# Altium PCB VA_HUB_PCB.PcbDoc (part 8 of 12)
Units mil, origin at the board's own origin, x right, y up, seen from the top; angles counter-clockwise.
Board outline 4408 x 3619 mil, 8 copper layers (Top Layer, Routing 1, Routing 2, Power Plane, GND Plane, Routing 3, Routing 4, Bottom Layer), stack 85.156 mil thick; 569 components, 440 nets, 2911 pads, 1518 vias.
Unrouted connection lines stored in the file: 46.
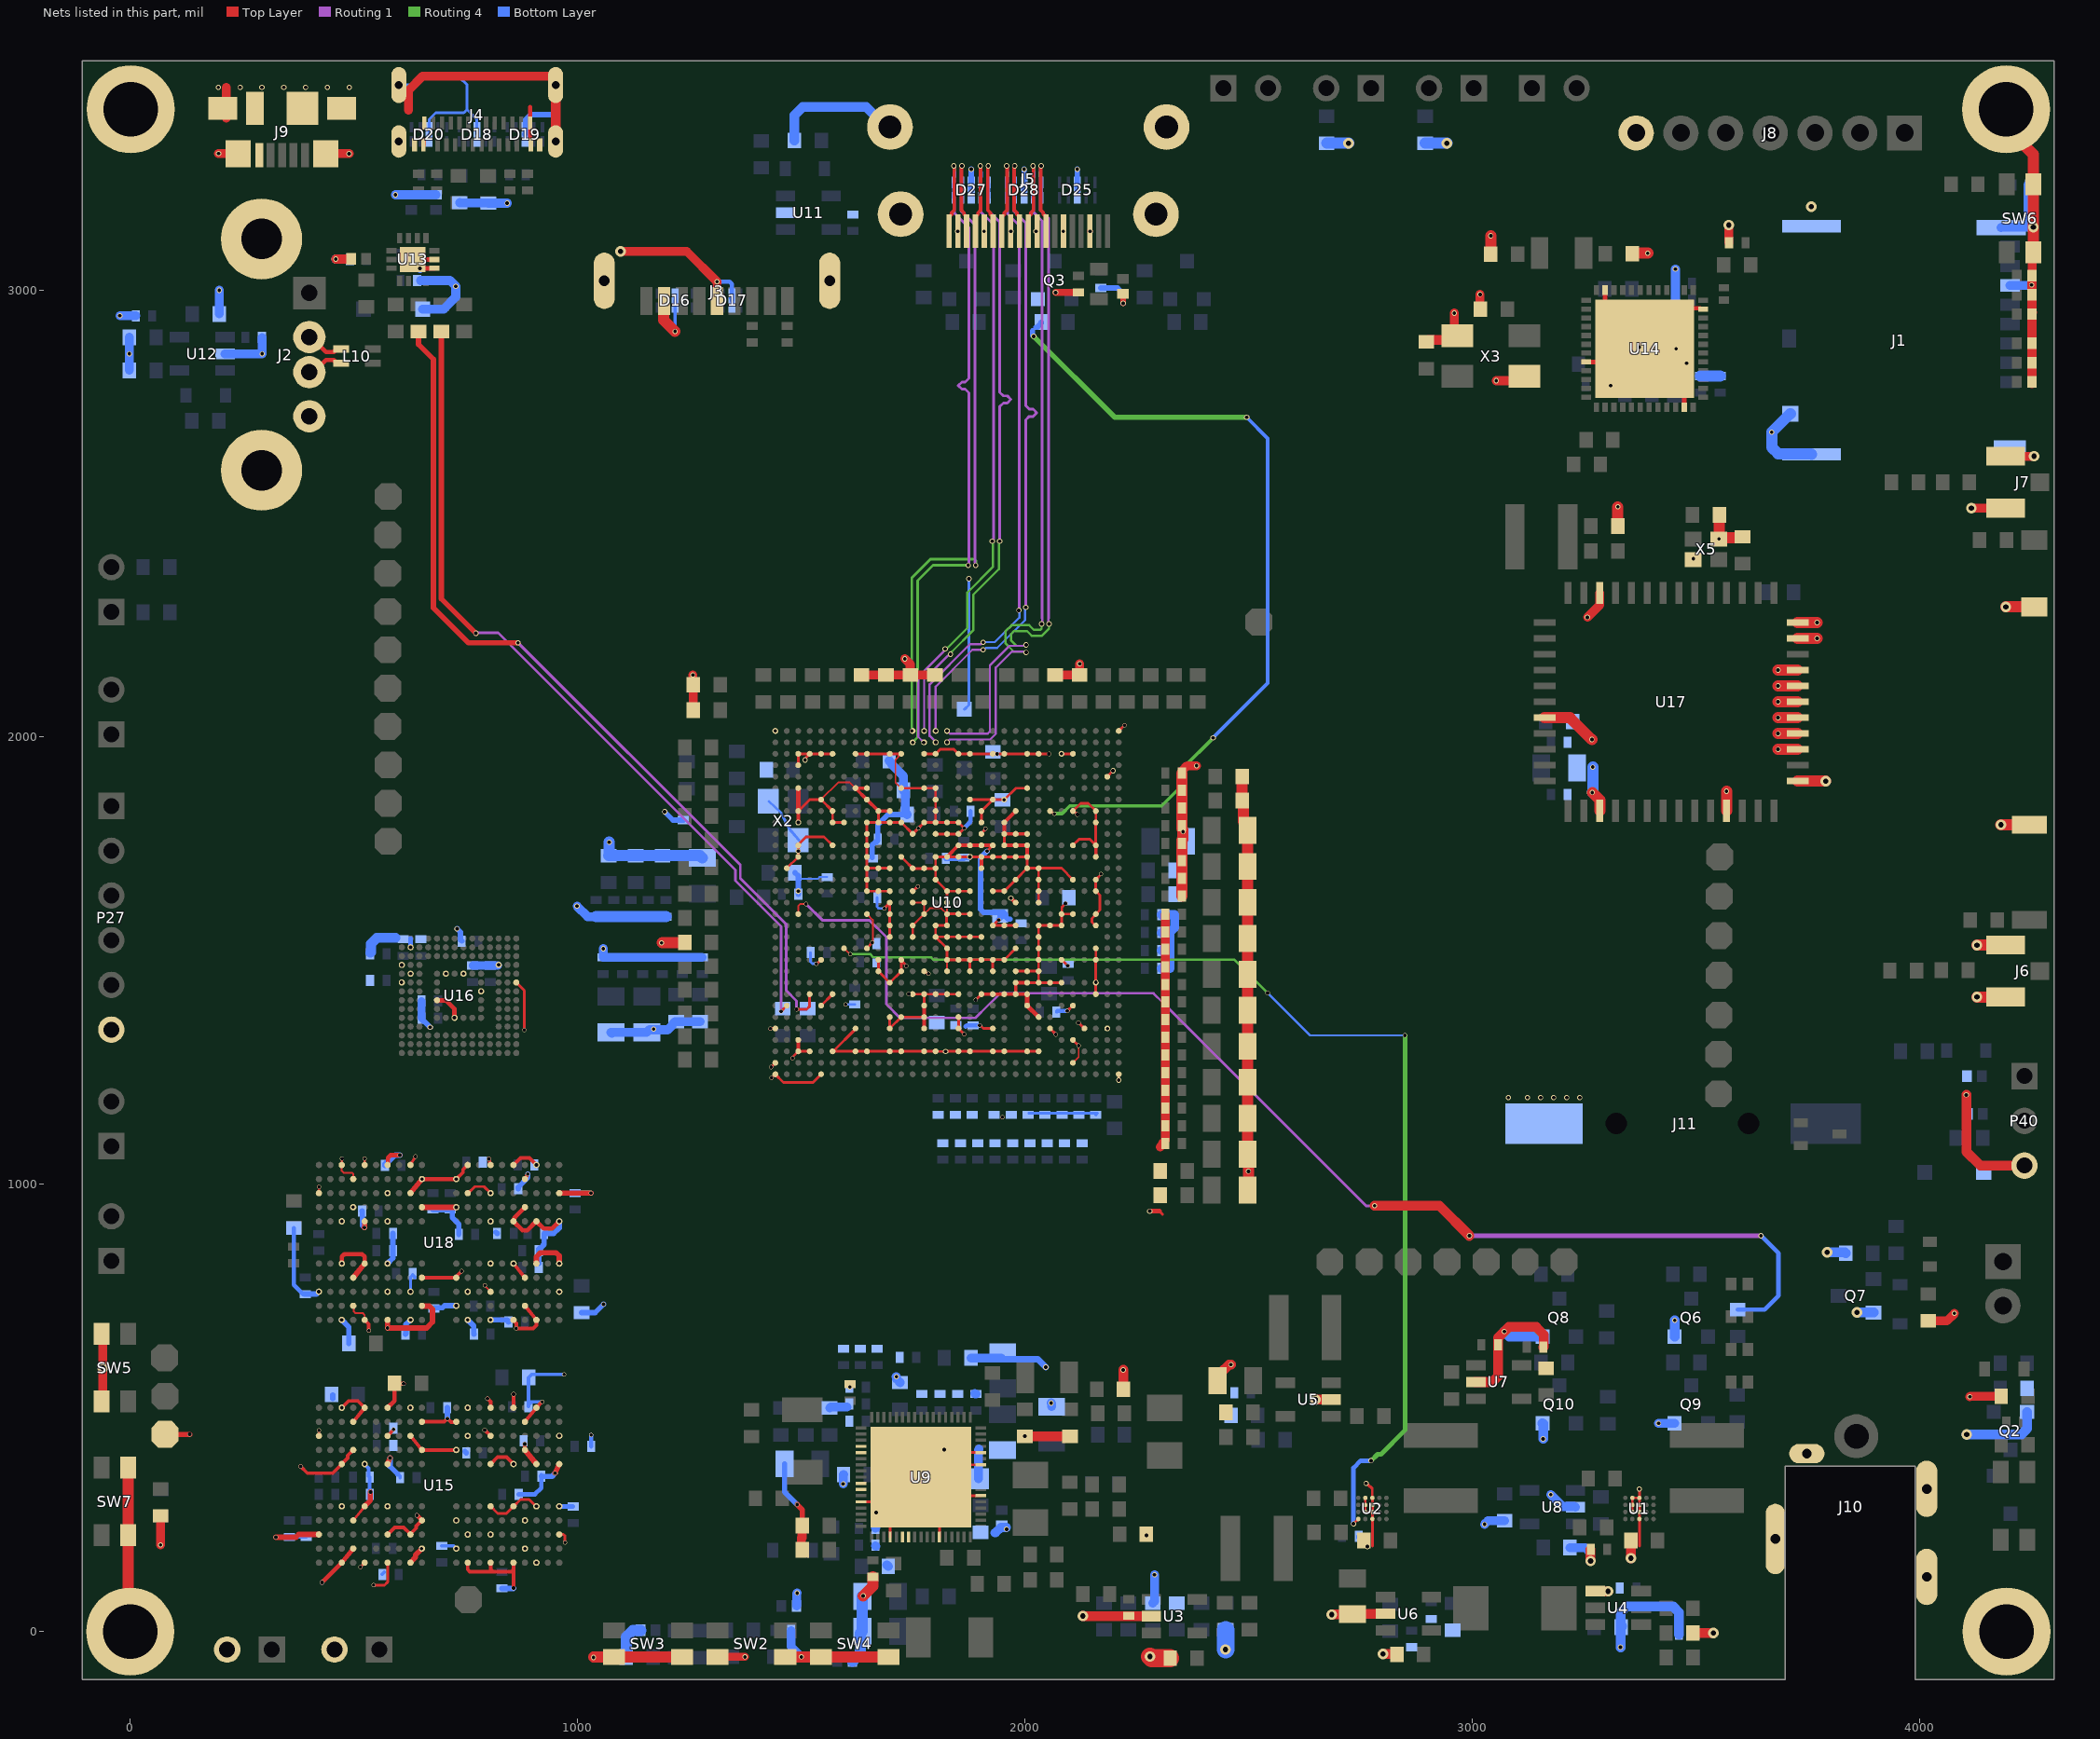
[diagram p11: the nets of this part, all layers, seen from the top]

## Via types
v1: diameter 9.84, hole 7.87, Top Layer to Bottom Layer, 821 vias
v2: diameter 11.81, hole 7.87, Top Layer to Bottom Layer, 575 vias
v3: diameter 23.62, hole 11.81, Top Layer to Bottom Layer, 122 vias

## Nets (pads, with @x,y where several pads share a name; then routed paths per layer and width w, separated by ;. In a path a pad name is that pad's centre, name@x,y a point inside that pad or via, vN(x,y) a via of type N, cw(c..) or ccw(c..) an arc to the next point about the centre after c; other vN are vias at no path point) (continued)
GND: ANT1.2 ANT2.2 C2.2 C3.2 C4.2 C5.2 C6.2 C8.2 C10.2 C11.2 C12.2 C13.2 C14.2 C15.2 C16.2 C17.2 C18.2 C19.2 C20.2 C21.2 C22.2 C23.2 C25.2 C26.1 C27.1 C28.2 C29.2 C30.2 C31.1 C32.1 C33.2 C35.2 C36.2 C37.2 C38.2 C39.2 C40.2 C41.2 C42.2 C44.2 C45.1 C46.2 C47.2 C48.2 C49.1 C50.1 C51.2 C52.2 C53.2 C54.2 C55.2 C56.2 C57.2 C58.2 C59.2 C60.2 C62.2 C63.2 C64.2 C65.2 C66.2 C67.2 C68.2 C69.2 C70.2 C71.2 C72.2 C73.2 C74.2 C75.2 C76.2 C77.2 C78.2 C79.2 C80.2 C81.2 C82.2 C83.2 C84.2 C85.2 C86.2 C87.2 C88.2 C89.2 C90.2 C91.2 C92.2 C93.2 C94.2 C95.2 C96.2 C97.2 C98.2 C99.2 C100.2 C101.2 C102.2 C103.2 C104.2 C105.2 C106.2 C107.2 C108.2 C109.2 C110.2 C111.2 C112.2 C113.2 C114.2 C115.2 C116.2 C117.2 C118.2 C119.2 C120.2 C121.2 C122.2 C123.2 C124.2 C125.2 C126.2 C127.2 C128.2 C129.2 C130.2 C131.2 C132.2 C133.2 C134.2 C135.2 C136.2 C137.2 C138.2 C139.2 C140.2 C141.2 C142.2 C143.2 C144.2 C145.2 C146.2 C147.2 C148.1 C149.1 C150.2 C151.1 C152.2 C153.2 C154.2 C155.2 C156.2 C157.2 C158.2 C161.2 C162.2 C163.2 C164.2 C165.2 C166.2 C173.2 C174.2 C175.2 C176.2 C177.2 C178.2 C179.2 C180.2 C181.1 C182.1 C183.2 C184.1 C185.1 C186.1 C187.1 C188.2 C189.2 C190.2 C191.2 C192.2 C193.2 C194.2 C195.2 C196.2 C197.2 C198.2 C199.2 C200.2 C201.2 C202.2 C203.2 C204.2 C205.2 C206.2 C207.2 C208.2 C209.2 C210.2 C211.2 C212.2 C213.2 C214.2 C215.2 C216.2 C217.2 C218.2 C219.2 C220.2 C221.2 C222.2 C223.2 C224.2 C225.2 C226.2 C227.2 C228.2 C229.2 C230.1 C231.2 C232.2 C233.2 C234.2 C235.2 C236.2 C237.2 C238.2 C241.2 C242.2 C243.1 C244.1 C245.2 C246.2 C247.2 C248.2 C249.2 C250.2 C251.2 C252.2 C253.2 C254.2 C255.2 C256.2 C257.2 C258.2 C259.2 C260.2 C261.2 D2.1 D4.1 D5.1 D6.2 D8.1 D9.2 D10.2 D11.2 D12.2 D13.2 D14.2 D16.3_8 D17.3_8 D18.3_8 D19.3_8 D20.3_8 D22.1 D23.2 D24.2 D25.3_8 D26.2 D27.3_8 D28.3_8 D31.1 D32.2 D33.2 ESD1.2 ESD2.2 J1.6 J1.9 J1.P1 J1.P2 J1.P3 J1.P4 J2.4 J2.MH1 J2.MH2 J3.4 J3.7 J3.MH1 J3.MH2 J4.A1 J4.A12 J4.B1 J4.B12 J4.G1 J4.G2 J4.S1 J4.S2 J4.S3 J4.S4 J5.2 J5.5 J5.8 J5.11 J5.14 J5.17 J5.MH1 J5.MH2 J5.MH3 J5.MH4 J6.2 J6.3 J7.2 J7.3 J8.7 J9.5 J9.MP1 J9.MP2 J9.MP3 J9.MP4 J9.MP5 J9.MP6 J10.2 J10.3 J10.4 J10.5 J11.2 P10.2 P16.2 P25.1 P27.6 P40.3 pad.MH1 pad.MH2 pad.MH3 pad.MH4 Q2.2 Q6.2 Q7.2 Q8.2 Q9.2 Q10.2 R4.2 R6.1 R15.2 R18.2 R25.2 R29.1 R32.1 R34.1 R38.1 R47.1 R48.1 R50.2 R51.2 R52.2 R56.2 R59.2 R60.1 R61.1 R65.2 R75.2 R76.1 R77.2 R78.2 R80.2 R81.1 R82.1 R84.2 R88.1 R89.1 R101.2 R102.2 R119.1 SB28.1 SB33.2 SW2.2 SW3.2 SW4.2 SW5.2 SW6.2 SW7.1 U1.B2 U1.B3 U1.B4 U1.C1 U1.C2 U1.C3 U1.C4 U2.B2 U2.B3 U2.B4 U2.C1 U2.C2 U2.C3 U2.C4 U3.2 U4.1 U5.2 U6.2 U7.2 U8.2 U9.21 U9.22 U9.27 U9.28 U9.30 U9.38 U9.40 U9.41 U9.46 U9.57 U9.62 U9.64 U9.69 U10.A1 U10.A27 U10.A31 U10.AA3 U10.AA5 U10.AA9 U10.AA10 U10.AA11 U10.AA12 U10.AA13 U10.AA14 U10.AA15 U10.AA23 U10.AA26 U10.AA29 U10.AB9 U10.AB10 U10.AB11 U10.AB13 U10.AB15 U10.AB16 U10.AB17 U10.AB19 U10.AB23 U10.AC3 U10.AC11 U10.AC13 U10.AC15 U10.AC16 U10.AC17 U10.AC18 U10.AC20 U10.AC21 U10.AC22 U10.AC23 U10.AC25 U10.AC26 U10.AC29 U10.AD3 U10.AD5 U10.AD10 U10.AD13 U10.AD17 U10.AD21 U10.AD22 U10.AD26 U10.AD29 U10.AE11 U10.AE12 U10.AE14 U10.AE17 U10.AE23 U10.AE27 U10.AF9 U10.AF17 U10.AF18 U10.AF20 U10.AF23 U10.AF24 U10.AF29 U10.AG2 U10.AH29 U10.AJ5 U10.AJ6 U10.AJ8 U10.AJ9 U10.AJ11 U10.AJ12 U10.AJ14 U10.AJ15 U10.AJ17 U10.AJ18 U10.AJ20 U10.AJ21 U10.AJ23 U10.AJ24 U10.AJ26 U10.AJ27 U10.AJ28 U10.AJ29 U10.AL1 U10.AL31 U10.B5 U10.B31 U10.C8 U10.C9 U10.C11 U10.C12 U10.C14 U10.C15 U10.C17 U10.C18 U10.C20 U10.C21 U10.C23 U10.C24 U10.C26 U10.C28 U10.C29 U10.D5 U10.D29 U10.E2 U10.E4 U10.E7 U10.E12 U10.E15 U10.E18 U10.E21 U10.E24 U10.E31 U10.F8 U10.F15 U10.F18 U10.F20 U10.F21 U10.G5 U10.G9 U10.G18 U10.G27 U10.H3 U10.H9 U10.H10 U10.H11 U10.H12 U10.H13 U10.H15 U10.H16 U10.H17 U10.H18 U10.H19 U10.H26 U10.J3 U10.J6 U10.J7 U10.J8 U10.J9 U10.J10 U10.J21 U10.K8 U10.K9 U10.K10 U10.K12 U10.K14 U10.K16 U10.K18 U10.K20 U10.K22 U10.L3 U10.L6 U10.L8 U10.L11 U10.L12 U10.L13 U10.L14 U10.L15 U10.L16 U10.L20 U10.L22 U10.L27 U10.M3 U10.M8 U10.M10 U10.M16 U10.M23 U10.N8 U10.N13 U10.N14 U10.N15 U10.N16 U10.N17 U10.N19 U10.N21 U10.P3 U10.P6 U10.P7 U10.P8 U10.P10 U10.P11 U10.P12 U10.P16 U10.P17 U10.P19 U10.P21 U10.R3 U10.R5 U10.R6 U10.R14 U10.R15 U10.R16 U10.R18 U10.R21 U10.R23 U10.T8 U10.T10 U10.T16 U10.T18 U10.T19 U10.T21 U10.U3 U10.U8 U10.U11 U10.U12 U10.U14 U10.U15 U10.U16 U10.U19 U10.U21 U10.U22 U10.U23 U10.U29 U10.V3 U10.V5 U10.V8 U10.V10 U10.V17 U10.V23 U10.W8 U10.W9 U10.W13 U10.W17 U10.W18 U10.W19 U10.W21 U10.W22 U10.W23 U10.W30 U10.Y3 U10.Y9 U10.Y10 U10.Y11 U10.Y12 U10.Y13 U10.Y14 U10.Y15 U10.Y16 U10.Y17 U10.Y20 U10.Y23 U10.Y29 U11.2 U12.2 U13.8 U13.9 U13.15 U14.8 U14.23 U14.35 U14.47 U14.49 U15.A3 U15.A10 U15.AB3 U15.AB5 U15.AB8 U15.AB10 U15.C1 U15.C5 U15.C8 U15.C12 U15.D2 U15.D4 U15.D9 U15.D11 U15.E1 U15.E5 U15.E8 U15.E12 U15.G1 U15.G3 U15.G5 U15.G8 U15.G10 U15.G12 U15.J1 U15.J3 U15.J10 U15.J12 U15.K2 U15.K4 U15.K9 U15.K11 U15.N2 U15.N4 U15.N9 U15.N11 U15.P1 U15.P3 U15.P10 U15.P12 U15.T1 U15.T3 U15.T5 U15.T8 U15.T10 U15.T12 U15.V1 U15.V5 U15.V8 U15.V12 U15.W2 U15.W4 U15.W9 U15.W11 U15.Y1 U15.Y5 U15.Y8 U15.Y12 U16.A6 U16.C4 U16.E7 U16.G5 U16.H10 U16.J5 U16.K8 U16.N2 U16.N5 U16.P4 U16.P6 U17.1 U17.3 U17.4 U17.5 U17.6 U17.7 U17.8 U17.10 U17.11 U17.23 U17.32 U17.39 U17.47 U18.A3 U18.A10 U18.AB3 U18.AB5 U18.AB8 U18.AB10 U18.C1 U18.C5 U18.C8 U18.C12 U18.D2 U18.D4 U18.D9 U18.D11 U18.E1 U18.E5 U18.E8 U18.E12 U18.G1 U18.G3 U18.G5 U18.G8 U18.G10 U18.G12 U18.J1 U18.J3 U18.J10 U18.J12 U18.K2 U18.K4 U18.K9 U18.K11 U18.N2 U18.N4 U18.N9 U18.N11 U18.P1 U18.P3 U18.P10 U18.P12 U18.T1 U18.T3 U18.T5 U18.T8 U18.T10 U18.T12 U18.V1 U18.V5 U18.V8 U18.V12 U18.W2 U18.W4 U18.W9 U18.W11 U18.Y1 U18.Y5 U18.Y8 U18.Y12 X2.2 X2.4 X3.2 X3.4 X5.2 X5.4 | length 30451.4
  Top Layer w4: U18.C12@473.09,1043.23 473.09,1029.91 477,1026 496.34,1026 498.69,1023.66 U18.D11@498.69,1011.73 ; U18.D2@498.69,728.27 499.82,727.13 499.82,715.18 503,712 520,712 524.28,707.72 U18.E1@524.28,696.77 ; v1(793,774) 793,773.27 805.77,760.5 U18.T3@805.77,759.76 ; v1(908.13,1043.23) U18.Y12@908.13,1044.89 ; U10.AE27@1544.69,1860.23 1583.07,1898.62 1608.66,1898.62 U10.AF24@1621.46,1885.82 ; U10.C26@1570.28,1297.24 U10.C26@1571.04,1297.24 ; U10.R23@1647.05,1604.33 1660.03,1591.34 1660.03,1541.58 v1(1659.03,1540.58) ; U10.AF20@1723.82,1885.82 1711,1898.64 1711,1949.77 U10.AJ20@1723.82,1962.59 ; U10.R18@1775,1604.33 1787.68,1617 1813.51,1617 U10.R16@1826.18,1604.33 ; U10.W17@1800.59,1704.96 U10.W17@1801.46,1705.82 ; U10.L14@1877.37,1501.84 U10.L14@1877.37,1501.96 ; U10.T10@1979.73,1629.51 U10.T10@1979.73,1629.92 ; U10.M8@2030.91,1527.55 U10.M8@2030.91,1533 ; U10.B5@2107.68,1271.65 2120.48,1284.44 v1(2120.48,1310.03)
  Top Layer w5: U18.A10@422.05,980.37 v1(422.05,994.5) ; U15.A10@422.1,437.89 v1@422.1,449.75 ; v1(473.47,1057.5) 473.28,1057.31 473.28,1043.64 U18.C12@473.56,1043.36 ; U18.E12@524.41,1043.36 v1(524.41,1057.5) ; U10.N19@1749.41,1553.14 U10.P19@1749.41,1578.74 U10.R18@1775,1604.33 U10.T18@1775,1629.92 U10.T19@1749.41,1629.92 ; U10.N17@1800.59,1553.14 U10.N16@1826.18,1553.14 1826.46,1553.42 1851.5,1553.42 U10.N15@1851.77,1553.14 U10.N14@1877.37,1553.14 U10.N13@1902.96,1553.14 ; U10.K16@1826.18,1476.37 U10.L16@1826.18,1501.96 ; U10.R16@1826.18,1604.33 U10.T16@1826.18,1629.92 ; U10.L14@1877.37,1501.96 U10.L13@1902.96,1501.96 U10.L12@1928.55,1501.96 U10.L11@1954.14,1501.96
  Top Layer w6: U15.D4@498.69,249.68 U15.D4@498.69,248.5 U15.E5@524.28,280 ; v1(515,144) 515,144.37 524.28,153.65 U15.E1@524.28,154.02 ; v1(544,104) 544.26,103.74 568.74,103.74 575.46,110.46 U15.G1@575.46,154.02 ; v1(607.29,1490.51) 607.6,1490.51 U16.P4@608.19,1489.92 ; U18.J12@626.64,1043.23 v1(638,1062) ; v1(626.82,1470.82) U16.N5@626.97,1470.82 ; U16.K8@686.03,1411.77 U16.K8@686.9,1411.77 ; U16.J5@705.71,1470.82 v1(706.03,1470.82) U16.J5@706.27,1470.82 ; U16.G5@745.08,1469.95 U16.G5@745.08,1470.82 ; U18.P10@755.72,980.24 770.48,995 791.01,995 v1(805.77,980.24) ; U16.E7@784.45,1431.45 v1(784.82,1431.82) ; U15.T5@805.77,280 821.77,264 840.95,264 U15.V5@856.95,280 ; U15.V5@856.72,279.22 872.72,295.22 891.9,295.22 U15.Y5@907.9,279.22 ; U16.A6@863.19,1451.14 881,1433.33 v1(881,1345) ; U15.AB3@959.31,217.01 968.6,217.01 972.11,213.49 v1(972.11,199.08) ; v1(1431,1348.17) 1431.12,1348.3 1442.2,1348.3 U10.E31@1442.33,1348.42 ; v1(1433,1262) 1433,1262.16 1442.33,1271.49 U10.B31@1442.33,1271.65 ; v1(1434,1238) 1434.13,1238 1442.19,1246.06 U10.A31@1442.33,1246.06 1460.56,1227.82 1526.45,1227.82 U10.A27@1544.69,1246.06 ; U10.W30@1467.92,1706.69 U10.Y29@1493.51,1732.28 v2(1493.51,1745.07) U10.AA29@1493.51,1757.87 1493.51,1759.47 1511.04,1777 1551.15,1777 U10.AA26@1570.28,1757.87 ; v1(1480.71,1282.08) 1481.45,1282.81 1481.45,1285.18 U10.C29@1493.51,1297.24 U10.C28@1521.24,1297.24 ; U10.AD29@1493.51,1834.64 1519.1,1860.23 U10.AE27@1544.69,1860.23 U10.AD26@1570.28,1834.64 U10.AC26@1570.28,1809.05 U10.AC25@1595.87,1809.05 ; U10.AH29@1493.51,1937 U10.AJ29@1493.51,1962.59 U10.AJ28@1519.1,1962.59 ; v2(1509.06,1948.6) 1510.11,1949.65 1510.11,1953.61 U10.AJ28@1519.1,1962.59 ; v1(1534,1493) 1534.86,1493 1543.83,1501.96 U10.L27@1544.69,1501.96 ; U10.G27@1544.69,1399.6 U10.G27@1544.82,1399.74 ; U10.G27@1544.82,1399.82 U10.G27@1544.82,1399.74 ; U10.H26@1570.28,1425.19 U10.G27@1544.82,1399.74 ; U10.AJ26@1570.28,1962.59 U10.AJ27@1544.69,1962.59 U10.AJ28@1519.1,1962.59 ; U10.C26@1571.04,1297.24 U10.C26@1571.8,1297.24 ; U10.E24@1621.46,1348.42 1621.46,1346.9 U10.C26@1571.8,1297.24 ; U10.AJ24@1621.46,1962.59 U10.AJ23@1646.82,1962.59 ; U10.M23@1646.7,1527.72 1659.03,1540.06 v1(1659.03,1540.58) ; U10.AJ23@1647.05,1962.59 U10.AJ21@1698.23,1962.59 U10.AJ20@1723.82,1962.59 ; U10.L22@1672.64,1501.96 U10.K22@1672.64,1476.37 U10.J21@1698.23,1450.78 U10.K20@1723.82,1476.37 1723.8,1500.82 1723.8,1500.24 1735,1489.04 v1(1735,1488) ; U10.AD22@1672.64,1834.64 U10.AC22@1672.64,1809.05 ; v1(1686,1617) U10.T21@1698.23,1629.23 ; U10.F21@1698.23,1374.01 U10.E21@1698.23,1348.42 U10.F20@1723.82,1374.01 U10.F18@1775,1374.01 ; U10.N21@1698.23,1553.14 U10.P21@1698.23,1578.74 U10.R21@1698.23,1604.33 U10.T21@1698.23,1629.23 ; U10.T21@1698.23,1629.92 U10.T21@1698.23,1629.23 ; U10.U21@1698.23,1655.51 U10.U22@1672.64,1655.51 U10.U23@1647.05,1655.51 U10.V23@1647.05,1681.1 U10.W23@1647.05,1706.69 ; U10.W21@1698.23,1706.69 U10.W22@1672.64,1706.69 U10.W23@1647.05,1706.69 ; U9.38@1698.97,211.33 1698.97,276.29 1712.75,290.07 U9.69@1767.87,345.19 ; U10.L20@1723.82,1501.58 U10.L20@1723.82,1501.96 ; U10.Y20@1723.82,1732.28 1736.62,1719.48 ; U10.AF20@1723.82,1885.82 U10.AF18@1775,1885.82 U10.AF17@1800.59,1885.82 U10.AE17@1800.59,1860.23 U10.AD17@1800.59,1834.64 U10.AC17@1800.59,1809.05 ; 1730.16,1725.82 1749.41,1706.56 U10.W19@1749.41,1706.69 ; v1(1740.4,1425.6) 1749.01,1425.6 U10.H19@1749.41,1425.19 U10.H18@1775,1425.19 ; U10.N19@1749.36,1553.14 U10.N19@1749.41,1553.14 ; U10.T19@1749.41,1629.57 1749.32,1629.57 U10.T19@1749.49,1629.74 ; U10.U19@1749.41,1655.51 1749.96,1655.51 1760.45,1666 v1(1761,1666) ; U10.W19@1749.82,1705.82 1801.46,1705.82 U10.W17@1800.59,1706.69 U10.Y17@1800.59,1732.28 U10.Y16@1826.18,1732.28 U10.Y15@1851.77,1732.28 v1(1877.37,1732.28) U10.Y13@1902.96,1732.28 U10.Y12@1928.55,1732.28 U10.Y11@1954.14,1732.28 U10.Y10@1979.73,1732.28 U10.Y9@2005.32,1732.28 U10.W9@2005.32,1706.69 ; U10.AJ18@1774.71,1962.3 U10.AJ18@1775,1962.59 U10.AJ17@1797.4,1962.59 ; U10.G18@1775,1399.6 U10.H18@1775,1425.19 ; U10.K18@1775,1476.37 1776.9,1476.37 1781.61,1471.66 1784.37,1471.66 v1(1785.11,1470.92) ; U9.69@1795.43,400.31 U9.64@1901.73,400.31 ; U10.W17@1800.59,1704.96 U10.V17@1800.59,1681.1 U10.V17@1800.59,1681.1 1813.33,1668.43 1813.39,1668.43 1813.39,1668.37 U10.U16@1826.18,1655.51 U10.U16@1826.18,1655.51 1826.18,1631.72 U10.T16@1825.38,1630.91 ; U10.AB17@1800.59,1783.46 U10.AB16@1826.18,1783.46 U10.AB15@1851.77,1783.46 v1(1864.57,1796.26) 1852,1808.82 1851.82,1808.82 1851.59,1809.05 U10.AC16@1826.18,1809.05 U10.AC17@1800.59,1809.05 ; U10.AJ17@1800.59,1962.59 1811,1973 1841.37,1973 U10.AJ15@1851.77,1962.59 U10.AJ14@1877.37,1962.59 U10.AJ12@1928.55,1962.59 1928.84,1962.3 1940.7,1962.3 1941,1962 1941.3,1962.3 1953.84,1962.3 U10.AJ11@1954.14,1962.59 U10.AJ9@2005.32,1962.59 U10.AJ8@2030.91,1962.59 ; U9.46@1809.21,211.33 U9.69@1809.21,303.85 ; v2@1822.76,1297.24 U10.C15@1851.77,1297.24 U10.C14@1877.37,1297.24 U10.C12@1928.55,1297.24 U10.C11@1954.14,1297.24 U10.C9@2005.32,1297.24 U10.C8@2030.91,1297.24 ; v2(1823,1297) 1822.88,1297.12 1800.71,1297.12 U10.C17@1800.59,1297.24 U10.C21@1698.23,1297.24 U10.C23@1647.05,1297.24 U10.C24@1621.46,1297.24 U10.C26@1571.8,1297.24 ; U10.U16@1827.4,1655.51 U10.U15@1851.77,1655.51 U10.U14@1877.37,1655.51 U10.U14@1877.37,1655.45 ; U10.E15@1851.77,1348.42 U10.E15@1851.77,1348.36 ; U10.F15@1851.77,1374.01 U10.E15@1851.77,1348.36 ; U10.H15@1851.77,1425.19 U10.H16@1826.18,1425.19 U10.H18@1775,1425.19 ; U9.69@1864.32,248.73 U9.69@1809.21,303.85 ; v1(1864.45,1335.62) 1864.45,1335.69 U10.E15@1851.77,1348.36 ; U10.K14@1877.37,1476.37 1877.37,1501.84 1851.9,1501.84 U10.L15@1851.77,1501.96 U10.L16@1826.18,1501.96 U10.M16@1826.18,1527.55 U10.N17@1800.59,1553.14 U10.P17@1800.59,1578.74 U10.P16@1826.18,1578.74 1825.08,1579.84 1825.08,1603.22 U10.R16@1826.18,1604.33 1826.78,1604.92 1851.18,1604.92 U10.R15@1851.77,1604.33 U10.R14@1877.37,1604.33 ; U10.AE14@1877.37,1860.23 U10.AE12@1928.55,1860.23 ; v1(1890.29,1412.4) v1(1890.29,1412.4) U10.H13@1903.02,1425.19 ; v1(1899,1355.5) 1900.04,1355.5 1907.12,1348.42 U10.E12@1928.55,1348.42 ; U9.57@1901.73,303.85 U9.69@1809.21,303.85 ; U9.62@1901.73,372.75 1795.43,372.75 U9.69@1767.87,345.19 ; U10.AB13@1902.96,1783.46 1902.96,1784.92 1912,1793.96 v1(1912,1795) ; U10.AC13@1902.96,1809.05 U10.AD13@1902.96,1834.64 U10.AE12@1928.55,1860.23 ; v1(1915.75,1745.07) U10.AA12@1928.55,1757.87 ; U10.K12@1928.55,1476.37 U10.L12@1928.55,1501.96 ; U10.P12@1928.55,1578.74 U10.P11@1954.14,1578.74 U10.P10@1979.73,1578.74 ; U10.P12@1928.55,1578.78 1928.68,1578.78 1941.91,1592 v1@1942,1592 ; U10.U12@1928.55,1655.51 1928.55,1655.45 1928.67,1655.57 U10.U11@1954.14,1655.51 ; v1(1953.82,1859.71) U10.AE11@1954.38,1860.27 ; U10.L11@1954.14,1501.96 U10.M10@1979.73,1527.55 ; U10.U11@1954.14,1655.51 U10.U11@1954.14,1655.51 ; U10.AA11@1954.14,1757.87 U10.AB11@1954.14,1783.46 ; U10.V10@1979.73,1681.1 U10.U11@1954.14,1655.51 ; U10.K10@1979.73,1476.37 U10.K9@2005.32,1476.37 U10.K8@2030.91,1476.37 ; U10.V10@1979.73,1681.1 U10.W9@2005.32,1706.69 ; U10.J9@2005.32,1450.78 U10.J8@2030.91,1450.78 ; U10.AF9@2005.32,1885.82 1980,1885.82 1954.41,1860.23 U10.AE12@1928.55,1860.23 ; U10.M8@2030.91,1527.55 U10.L8@2030.91,1501.96 U10.K8@2030.91,1476.37 ; U10.M8@2030.91,1533 U10.N8@2030.91,1553.14 U10.P8@2030.91,1578.74 U10.P7@2056.5,1578.74 U10.P6@2082.09,1578.74 2082.05,1578.78 2082.05,1591.95 2082,1592 ; U10.T8@2030.91,1629.92 U10.U8@2030.91,1655.51 U10.V8@2030.91,1681.1 U10.W8@2030.91,1706.69 2082.09,1706.69 U10.V5@2107.68,1681.1 ; U10.W8@2031.06,1706.84 2030.91,1707 2030.6,1706.69 U10.W9@2005.32,1706.69 ; U10.AJ8@2031.21,1962.3 v1(2054.52,1962.3) ; U10.E7@2056.5,1348.42 v1@2069.3,1335.62 ; U10.J6@2082.09,1450.78 U10.J7@2056.5,1450.78 U10.J8@2030.91,1450.78 ; U10.L6@2082.09,1501.96 2082.98,1501.96 v1(2096.21,1488.74) ; v1(2082.09,1962.59) 2105.41,1962.59 U10.AJ5@2106,1962 ; v1(2091,1628) 2082.82,1619.82 2082.82,1605.06 U10.R6@2082.09,1604.33 ; v1(2094.88,1387.58) 2095.27,1387.58 2107.29,1399.6 U10.G5@2107.68,1399.6 ; U10.D5@2107.68,1322.83 v1(2120.48,1310.03) ; U10.R5@2107.68,1604.33 U10.R6@2082.09,1604.33 ; U10.AA5@2107.68,1757.87 2121.81,1772 2144.73,1772 U10.AA3@2155.73,1761 ; v1(2117.56,1826.66) 2109.57,1834.64 U10.AD5@2107.68,1834.64 2125.04,1852 2141.93,1852 2158.86,1835.07 U10.AD3@2158.86,1834.64 2158.93,1834.57 2158.93,1827.92 ; v1(2120,1361) 2120.35,1361 2132.93,1348.42 U10.E4@2133.27,1348.42 ; U10.H3@2158.86,1425.19 U10.J3@2158.86,1450.78 U10.L3@2158.86,1501.84 ; U10.J3@2158.86,1451.92 v1(2159,1451.92) ; U10.M3@2158.86,1527.55 2159,1527.42 U10.L3@2159,1502 ; U10.P3@2158.86,1578.74 2157.26,1578.74 2150,1586 2150,1594.3 2158.86,1603.17 U10.R3@2158.86,1604.33 2168,1613.46 2168,1646.37 U10.U3@2158.86,1655.51 U10.V3@2158.86,1681.1 ; U10.V3@2158.86,1681.1 2158.86,1681.63 2170.66,1693.42 v1(2170.66,1693.95) ; U10.AA3@2158.86,1757.87 U10.AA3@2155.73,1761 ; 2159,1827.92 2158.93,1827.85 2158.93,1809.12 U10.AC3@2158.86,1809.05 2158.08,1808.27 2158.08,1763.35 U10.AA3@2155.73,1761 ; U10.E2@2184.45,1348.42 2184.58,1348.42 v1(2185,1348) ; U10.AG2@2184.45,1911.41 2184.45,1911.77 2197.25,1924.56 v2(2197.25,1924.92) ; v2(2210,1233) U10.A1@2210.04,1246.06 ; U10.AL1@2210.04,2013.77 v1(2222.84,2026.57) ; 2301,940 2308,933 ; U2.B4@2761.33,298.82 U2.B3@2761.33,283.07 U2.B2@2761.33,267.33 U2.C2@2777.07,267.33 ; v2(2763,331) 2764.57,331 2771.7,323.87 2772.71,323.87 2776.95,319.63 2776.95,298.95 U2.C4@2777.07,298.82 U2.C3@2777.07,283.07 U2.C2@2777.07,267.33 ; 2777.07,190.82 U2.C1@2777.07,251.58 U2.C2@2777.07,267.33 ; U1.B2@3358.33,267.33 U1.B3@3358.33,283.07 U1.B4@3358.33,298.82 U1.C4@3374.07,298.82 ; v2(3373.82,318.82) 3374.07,318.57 U1.C4@3374.07,298.82 ; 3374.07,190.82 U1.C1@3374.07,251.58 U1.C2@3374.07,267.33 U1.C3@3374.07,283.07 U1.C4@3374.07,298.82 ; U10.W23@1647.05,1706.69 U10.Y23@1647.05,1732.28 U10.AA23@1647.05,1757.87 U10.AB23@1647.05,1783.46 U10.AC23@1647.05,1809.05 U10.AC22@1672.64,1809.05 ; U10.AC22@1672.64,1809.05 U10.AC21@1698.23,1809.05 U10.AC20@1723.82,1809.05 U10.AB19@1749.41,1783.46 v1(1762.21,1796.26) U10.AC18@1775,1809.05 U10.AC17@1800.59,1809.05 ; U9.69@1767.87,345.19 U9.69@1809.21,303.85 ; U10.J8@2030.91,1450.78 U10.K8@2030.91,1476.37 ; 2082.05,1592.05 2082.05,1604.28 U10.R6@2082.09,1604.33 ; 2082,1592 2082.05,1592.05
  Top Layer w7: U9.30@1634.01,290.07 U9.69@1712.75,290.07
  Top Layer w8: v1(381,369) 396,354 452.61,354 486.38,387.78 486.38,393.68 U15.D9@498.69,405.98 ; v1(473.09,500.47) 488.18,515.56 509.19,515.56 U15.E12@524.28,500.47 U15.D11@498.69,468.98 U15.D11@499.87,470.16 ; v1(498,949) 498.43,949 U18.D9@498.69,948.74 ; U18.E1@524.28,696.77 533.42,687.58 v1(533.42,673) ; U15.G3@575.46,217.01 591.45,233 611.38,233 626.3,218.07 639.43,231.2 639.43,235.71 U15.K4@652.23,248.5 ; U15.G10@575.46,437.48 v1(589,452) ; U15.J10@626.64,437.48 U15.K9@652.23,405.98 v1(729,406) ; U15.K11@652.23,468.98 701.98,468.98 v1@708.65,475.65 ; U18.K4@652.23,791.26 726.26,791.26 v1(741,806) ; v1(709,476) 709.5,476 717.26,468.23 728.26,468.23 U15.N11@729,468.98 ; v1(729,948.74) U18.N9@730.18,949.92 ; v1(729,1011.73) 744,1026.73 744,1032.64 U18.P12@754.59,1043.23 ; U15.P1@754.59,154.02 754.59,138.69 759.28,134 811.35,134 ; v1(792.6,450.65) U15.T10@805.77,437.48 ; v1(799,521) 799,520.5 805.77,513.73 U15.T12@805.77,500.47 ; v1(802,1057) U18.T12@805.77,1043.23 ; U15.T1@805.77,154.02 805.77,139.57 811.35,134 ; U15.T8@805.77,374.49 821.28,390 841.44,390 v1(856.95,374.49) ; U15.V1@856.95,154.02 857,153.97 857,138.69 856.95,138.64 ; U15.V12@856.95,500.47 v1(856.95,530.67) ; U18.V1@856.95,696.77 856.95,695.1 863.05,689 v1(863.05,677.82) 900.82,677.82 908,685 ; v1(856.95,822.76) U18.W4@882.54,791.26 ; U18.V12@856.95,1043.23 872.72,1059 892.36,1059 v1(908.13,1043.23) ; v1(857,97) 856.95,97.05 856.95,138.64 ; U15.W11@881.36,470.16 U15.W11@882.54,468.98 U15.Y12@908.13,500.47 908.13,500.8 v1(921,513.67) ; v1(882,419) 882.27,418.73 U15.W9@882.27,406.26 ; U18.W2@882.54,728.27 883.72,726.81 U18.Y1@908.13,696.77 ; U18.W11@882.54,1011.73 v1(889,1023) ; 908,687 U18.Y1@908,696.64 ; U10.C29@1493.51,1297.24 U10.D29@1493.51,1322.83 ; v1(1493.51,1809.05) U10.AD29@1493.51,1834.64 ; U10.AF23@1647.05,1885.82 U10.AF24@1621.46,1885.82 U10.AE23@1647.05,1860.23 U10.AD22@1672.64,1834.64 U10.AD21@1698.23,1834.64 ; U10.T19@1749.31,1629.92 U10.T19@1749.41,1629.92 ; U10.E18@1775,1348.42 U10.F18@1775,1374.01 U10.G18@1775,1399.6 ; U10.Y16@1826.18,1732.28 U10.AA15@1851.77,1757.87 U10.AA14@1877.37,1757.87 U10.AA13@1902.96,1757.87 U10.AA12@1928.55,1757.87 ; U10.W13@1902.96,1706.69 U10.Y13@1902.96,1732.28 ; U10.H13@1903.02,1425.19 U10.H12@1928.55,1425.19 U10.H11@1954.14,1425.19 U10.H10@1979.73,1425.19 ; U10.AA11@1954.14,1757.87 U10.AA10@1979.73,1757.87 U10.AA9@2005.32,1757.87 U10.Y9@2005.32,1732.28 ; v2(1969,1640) U10.T10@1979.08,1629.92 ; 1970,1824.96 1954.14,1809.09 U10.AB11@1954.14,1783.46 U10.AB10@1979.73,1783.46 U10.AB9@2005.32,1783.46 ; 1970.04,1825 U10.AD10@1979.73,1834.64 ; U10.T10@1979.73,1629.51 U10.T10@1980.82,1629.51 ; U10.H9@2005.32,1425.19 U10.H10@1979.73,1425.19 ; U10.J9@2005.32,1450.78 U10.J10@1979.73,1450.78 U10.H10@1979.73,1425.19 ; U10.Y3@2158.57,1732.28 2158.86,1732.57 U10.AA3@2158.86,1757.87 ; 811.35,134 852.31,134 856.95,138.64
  Top Layer w10: v1(429.08,110) U15.C1@473.09,154.02 U15.D2@498.69,185.51 ; v1(473.09,822.76) 473.09,838.14 478.95,844 518.42,844 524.28,838.14 U18.E5@524.28,822.76 ; U15.G12@575.46,500.47 591,516.02 C200.2@591,555 592,554 v1(611,554) ; U18.G12@575.46,1043.23 576.25,1044.03 576.25,1059.14 582.11,1065 v1(603,1065) ; J4.S3@600.63,3331.77 J4.S3@608.5,3323.89 ; 622.5,3443.5 657,3478 659,3480 ; U18.J1@625.27,698.13 626.87,698.13 U18.J1@627.44,698.7 ; v1(641,260) 652.23,248.77 U15.K4@652.23,248.5 ; v2(648,3048) 648,3051.64 U13.15@631.82,3067.82 U13.9@679.66,3067.82 ; U13.15@649.82,3049.82 651.51,3048.14 U13.8@679.66,3048.14 ; v1(652.23,1011.73) v1(729,1011.73) ; J4.A12@655.74,3323.89 J4.A12@655.74,3333.58 ; U16.K8@686.03,1411.77 686.75,1411.04 706.6,1411.04 724.67,1392.97 724.67,1372.97 U16.H10@724.82,1372.82 ; U18.P10@754.59,981.37 U18.P10@754.59,980.24 U18.P10@755.72,980.24 ; U18.W9@882.54,948.74 861.93,928.12 ccw(c872.01,918.04) 857.92,920.22 cw(c848.04,921.78) U18.V8@856.95,917.24 877.2,897 887.89,897 U18.Y8@908.13,917.24 924.22,901.16 943.23,901.16 v1(959.31,917.24) ; J4.A1@893.93,3335.55 J4.B12@893.93,3373.11 ; J4.B12@893.93,3373.11 893.97,3408.97 ; J4.S1@951.02,3457.75 J4.S1@951.02,3469.16 ; U10.AD29@1493.51,1834.64 U10.AF29@1493.51,1885.82 ; U10.H9@2005.32,1425.19 U10.G9@2005.32,1399.6 U10.F8@2030.91,1374.01 ; v2(2279.17,940) 2301,940 ; U14.8@3255.01,2838.82 3356.39,2838.82 U14.49@3385.92,2868.35 ; U14.47@3297.33,2999.25 U14.49@3297.33,2956.93 ; v2(3374,2872) 3372,2874 3349,2874 3349,2894 3349,2905.27 U14.49@3297.33,2956.93 ; v2(3456.35,2868.35) U14.49@3385.92,2868.35 ; U14.23@3474.5,2737.44 3474.5,2779.77 U14.49@3385.92,2868.35 ; U14.35@3516.82,2956.93 3511.9,2956.93 3510.03,2958.8 3476.36,2958.8 U14.49@3385.92,2868.35 ; U14.49@3297.33,2956.93 U14.49@3385.92,2868.35
  Top Layer w12: P25.1@77.82,440.82 v1(132.82,440.82) ; v1(326,211) 370.66,211 376.67,217.01 U15.A3@421.91,217.01 ; U18.D4@498.69,791.26 523.57,821.88 U18.E5@524.28,822.76 ; v1(524,903) U18.E8@524.28,917.24 ; U15.E5@524.28,280 524.28,280.59 537,293.31 v1(537,312) ; U15.G8@575.46,374.49 v1(581,388) ; U18.G1@575.46,696.77 v1(575.46,678.89) 662.89,678.89 676,692 676,720.82 668.97,727.85 652.64,727.85 U18.K2@652.23,728.27 ; U15.J1@626.64,154.02 626.64,154.6 638,165.97 638,171 651.66,184.66 651.66,185.3 v1(651.58,185.39) ; U18.J10@626.64,980.24 v1(652.23,1011.73) ; U18.K9@652.23,948.74 v1(729,948.74) ; v1(856.95,822.76) U18.V5@857.37,822.34 ; U15.W2@882.13,185.1 v1(882.54,185.51) ; U15.W9@882.27,406.26 U15.W9@882.54,405.98 U15.Y8@908.13,374.49 ; U18.Y5@908.13,822.76 908.13,838.13 917.03,847.03 951.97,847.03 959,840 959,823.07 v1(959.31,822.76) ; v1(950,354) U15.AB8@959.31,374.49 ; U18.AB10@959.31,980.24 v1(1030.24,980.24) ; v1(1491,284) 1502.82,272.18 C59.2@1502.82,236.82 ; J5.17@2145.62,3131.68 2145.62,3131.38 v2(2146,3131) ; D26.2@2219.82,2990.84 2220,2990.66 v2(2220,2970) ; C182.1@3573,3106.14 C182.1@3574.32,3104.82
  Top Layer w15: v2@2069.32,2994.32 C173.2@2119.82,2994.32
  Top Layer w18: SW2.2@1313.03,-56.71 v2(1374.35,-56.71)
  Top Layer w20: SW5.2@-61.18,520.19 v3(-61.18,589.82) SW5.2@-61.18,659.88 ; SB28.1@67.56,258.56 SB28.1@67.82,258.82 v2(67.82,193.82) ; v2@197.68,3304.44 J9.MP2@241.61,3304.44 ; J9.MP3@214.82,3383.82 214.82,3452.65 ; J9.MP1@437.48,3304.44 v2@489.42,3304.44 ; v2(459.82,3068.82) ESD2.2@494.09,3068.82 ; 622.5,3401.5 622.5,3443.5 622.5,3446.5 654,3478 657,3478 944.8,3478 951.02,3471.78 J4.S1@951.02,3469.16 ; v3(1096,3086) 1244.18,3086 v2(1311.82,3018.35) J3.7@1311.82,2974.89 ; v2(1258,2139) 1258,2117.64 R76.1@1258.82,2116.82 R75.2@1258.82,2060.51 ; 1500.86,210.14 1500.86,183.96 R47.1@1502,182.82 ; 1502,209 C59.2@1502,236 ; R78.2@1634.91,2138.82 R77.2@1689.68,2138.82 R82.1@1744.45,2138.82 ; v2(1732,2175) 1743.85,2163.15 1743.85,2138.82 R82.1@1744.45,2138.82 ; R81.1@1799.22,2138.82 R82.1@1744.45,2138.82 ; R60.1@2067.56,2138.82 R61.1@2122.62,2138.82 2122.62,2143.62 2122.82,2143.82 v2(2122.82,2163.91) ; v2(2271.82,214.73) R34.1@2271.82,217.82 ; 2302.82,1083.82 2307.82,1088.82 2307.82,1091.32 2314.32,1097.82 C114.2@2314.32,1170.42 C105.2@2314.32,1210.02 C107.2@2314.32,1249.62 C109.2@2314.32,1289.22 C111.2@2314.32,1328.82 C102.2@2314.32,1368.32 C100.2@2314.32,1407.63 C98.2@2314.32,1446.95 C96.2@2314.32,1486.26 C108.2@2314.32,1525.82 C106.2@2314.32,1564.51 C104.2@2314.32,1603.82 ; C82.2@2351.32,1919 2351.32,1924.28 2363.04,1936 v2(2384,1936) ; X3.2@2958.74,2888.82 2902.82,2888.82 C185.1@2897.82,2883.82 2900.7,2886.7 2956.62,2886.7 X3.2@2967.02,2897.1 ; X3.2@2960,2890.08 v2(2960,2948) ; v2(3017.82,2989.82) 3017.82,2957.82 C184.1@3018.82,2956.82 ; v2(3053.82,2796.92) 3107,2796.92 X3.4@3116.63,2806.55 ; v2(3257.82,2267.82) 3285.37,2295.37 U17.23@3285.37,2322.52 ; C182.1@3574,3106.14 v3(3574,3145) ; SB33.2@4019.82,694.82 4061.82,694.82 v2(4078.38,711.38) ; v2(4112.82,524.82) 4113.82,525.82 C27.1@4182.82,525.82 ; v3(4116.09,2511.68) v3(4116.09,2511.68) J7.3@4192.47,2511.75 ; v3(4128.82,1534.82) v3@4128.89,1534.89 ; J7.2@4192.47,2627.89 v3@4256.04,2627.89 ; SW6.2@4250.82,3082.82 4252.38,3081.26 4252.38,3032.65 D9.2@4251.55,3031.82 D11.2@4251.55,2988.82 4251.55,2951.09 D14.2@4252.82,2949.82 ; D14.2@4251.55,2945.82 4251.55,2790.09 D13.2@4251.82,2789.82
  Top Layer w22: J4.S4@951.02,3331.77 J4.S1@951.02,3457.75 ; v2(1999.87,436.83) C31.1@2100.87,436.83 ; v3(2129.82,34.82) 2130.26,34.39 U3.2@2283,34.39 ; v2(2220.06,584.94) 2220.82,584.18 R32.1@2220.82,541.82 ; C13.2@2430.82,560.82 2439.82,569.82 2439.82,579.82 2457.09,597.09 v2(2460.82,597.09) ; v3(2649.81,518.82) U5.2@2685,518.82 ; v3(2686.45,37.74) 2686.76,38.05 2732.05,38.05 2733.32,39.32 2806.14,39.32 U6.2@2806.64,39.82 ; v3(2800.82,-50.18) 2830.82,-50.18 C20.2@2831.82,-51.18 ; U7.2@3008.46,557.82 3044.94,557.82 3057.82,570.71 C23.2@3057.82,640.82 3057.82,656.82 3081.82,680.82 3143.55,680.82 3146.04,678.33 3160.44,663.93 3160.44,636.94 C25.2@3159.32,635.82 ; v3(3264.82,157.82) C18.2@3264.82,183.32 ; U4.1@3275.64,90.22 3276.04,89.82 v3(3303.82,89.82) ; v3(3354.82,163.82) C17.2@3354.82,203.82 ; R15.2@3493.82,-3.18 v3(3539.42,-3.18) ; v2(4104.82,1199.82) 4104.82,1073.18 4136.18,1041.82 P40.3@4234.82,1041.82
  Top Layer w25: pad.MH3@-4.65,4.65 SW7.1@-4.65,215.25 SW7.1@-4.65,366.82 ; v2@1035.82,-57.18 1081.56,-57.18 SW3.2@1082.03,-56.71 SW3.2@1233.61,-56.71 ; v2@1189,1540 1239,1540 R56.2@1239.82,1540.82 ; J3.4@1193.71,2974.89 1192.43,2973.61 1192.43,2932.43 1217.87,2907 v2(1218,2907) ; SW2.2@1464.61,-56.71 1504.32,-56.71 SW4.2@1544.04,-56.71 SW4.2@1695.61,-56.71 ; v2(1638.82,79.82) 1660.82,101.82 C45.1@1660.82,122.33 ; C97.2@2302,975 C97.2@2302.82,975.82 ; C91.2@2351.32,1644.63 C90.2@2351.32,1683.95 C89.2@2351.32,1723.26 2351.32,1769.32 2353.82,1771.82 2353.82,1792.57 2351.32,1795.07 C86.2@2351.32,1841.2 C84.2@2351.32,1880.51 C82.2@2351.32,1919 ; C92.2@2485.82,1911.82 C110.2@2485.82,1857.82 2488.32,1855.32 2488.32,1810.72 2497.82,1801.22 C93.2@2497.82,1791.22 C94.2@2497.82,1710.78 C95.2@2497.82,1630.34 C119.2@2497.82,1549.9 C103.2@2497.82,1469.46 C101.2@2497.82,1389.02 C99.2@2497.82,1308.58 C116.2@2497.82,1228.14 C117.2@2497.82,1147.7 C123.2@2497.82,1067.26 2500,1065.08 2500,989 C121.2@2497.82,986.82 ; C187.1@3041.82,3079.82 v2(3041.82,3120.82) ; U17.32@3161.95,2043.39 3218.86,2043.39 v2(3267.82,1994.43) ; v2(3268.82,1876.09) 3285.37,1859.54 U17.39@3285.37,1835.12 ; C245.2@3325.82,2471.82 v2(3325.82,2514.91) ; C186.1@3357.82,3080.82 3358.82,3081.82 v2(3392.82,3081.82) ; X5.4@3494.28,2397.18 3494.82,2397.73 v2(3494.82,2398.82) ; X5.2@3551.37,2442.46 v2(3552.09,2443.19) ; C243.1@3552.82,2496.82 3552.09,2496.09 v2(3552.09,2443.19) ; U17.47@3568.84,1835.12 v2(3568.82,1878.82) ; C244.1@3604.82,2447.82 3602.32,2445.32 3554.23,2445.32 v2(3552.09,2443.19) ; v2(3684,1972.51) U17.3@3727.7,1972.52 ; v2(3684,2007.94) U17.4@3727.7,2007.96 ; v2(3684,2043.37) U17.5@3727.7,2043.39 ; v2(3684,2078.81) U17.6@3727.7,2078.82 ; v2(3684,2114.24) U17.7@3727.7,2114.26 ; v2(3684,2149.67) U17.8@3727.7,2149.69 ; U17.1@3727.7,1901.66 v3(3790.38,1901.66) ; U17.10@3727.7,2220.55 v2(3771.38,2220.55) ; U17.11@3727.7,2255.99 v2(3771.38,2255.99) ; v3@4128.89,1418.75 J6.3@4192.47,1418.75 ; v3@4128.89,1534.89 J6.2@4192.47,1534.89 ; v3@4182.25,1804.12 ANT1.2@4245.82,1804.12 ; v3@4193.25,2291.02 ANT2.2@4256.82,2291.02 ; pad.MH2@4193.65,3403.64 4193.65,3363.78 4254.35,3303.07 SW6.2@4254.35,3084.03
  Top Layer w40: v3(2280,-56) 2283.61,-59.61 C14.2@2325.18,-59.61
  Bottom Layer w4: C148.1@1486.14,1695.86 C148.1@1486.14,1696.82 ; C148.1@1493.64,1688.36 1499,1683 1537,1683 1541,1687 C151.1@1558,1687 ; C136.2@2158.82,1155.32 C136.2@2162.66,1159.16
  Bottom Layer w6: v1(626.64,759.76) 626.64,792.64 C217.2@631.5,797.5 ; D20.3_8@668.31,3347.75 668.31,3381.31 683,3396 746,3396 753,3403 ; 743.5,3468.5 753,3459 753,3403 ; D18.3_8@775.31,3347.75 775.21,3347.86 775.21,3380.79 753,3403 ; D17.3_8@1340.26,2980.95 D17.3_8@1345.14,2976.07 ; X2.2@1428.36,1856.13 1454.82,1830.82 1465.68,1810.09 1473.67,1795.07 1494.45,1770.5 X2.4@1495.29,1769.52 ; C147.2@1521,1518 1521,1498 1525.26,1493.74 1533.26,1493.74 v1(1534,1493) ; v1(1599.32,1402.32) C146.2@1619.82,1402.32 ; C60.2@1607.82,546.82 1607,546 1608,546 v2(1609,547) ; C156.2@1670,1641 1670,1620.51 1673.51,1617 v1(1686,1617) ; D8.1@1865,2061.94 1875,2071.94 v2(1875,2354) ; v1(1950,1150) v1@1951,1149 ; C134.2@2008.98,1159.16 C136.2@2162.66,1159.16 ; C141.2@2070.5,1385 C141.2@2072.31,1386.81 ; C136.2@2158.82,1155.32 C136.2@2159.14,1155
  Bottom Layer w8: v1(326,211) 326.25,211.25 352.25,211.25 352.5,211.5 C205.2@394,211.5 ; v1(524.28,374.49) 524.28,373.99 533.45,364.81 533.45,347.05 C191.2@535.5,345 C192.2@535.5,307 ; C192.2@535.5,310.5 v1(537,312) ; C206.2@563.5,128 C206.2@567.96,132.45 ; C195.2@597.44,352.5 598.5,352.5 603.5,347.5 C195.2@603.5,344 ; J4.S2@600.63,3457.75 633.75,3457.75 654,3478 734,3478 743.5,3468.5 ; C217.2@631.5,797.5 C217.2@636.5,792.5 ; C260.2@673,727 677.5,722.5 C260.2@679,722.5 ; C207.2@697,191.5 722.51,191.5 728.63,185.39 v1(728.87,185.39) ; C199.2@890.5,503 C199.2@890.5,506.5 ; v1@920.5,513.67 897.67,513.67 C199.2@890.5,506.5 ; v1(970,575) 898,575 C196.2@891,568 890.5,567.5 C199.2@890.5,506.5 ; C203.2@989.75,279.75 C203.2@990,279.5 ; v2(1218,2907) v2(1218,2907) 1218.07,2976.01 D16.3_8@1218.14,2976.07
  Bottom Layer w10: C220.2@366,902 366,775 386.5,754.5 C229.2@390,754.5 ; v1(626.97,1529.88) 626.97,1549.56 ; C204.2@868.5,307 905,307 919.08,321.08 C194.2@919.08,350.08 ; v1(959.42,280) 959.67,279.75 C203.2@989.75,279.75 ; C202.2@1030.5,414 v1(1030.5,439.5) ; v2(1311.82,3018.35) 1339.65,3018.35 1345.14,3012.86 D17.3_8@1345.14,2976.07 ; v1(1864.57,1796.26) 1878.82,1810.51 C145.2@1878.82,1833.82 ; 1867.82,1352.82 1870.5,1355.5 v1(1899,1355.5) ; C141.2@2072.31,1386.81 2073.08,1387.58 v1(2094.88,1387.58) ; C15.2@2746.32,212.82 2746.32,209.32 v2(2765.82,189.82)
  Bottom Layer w12: C229.2@390,754.5 416.65,754.5 v1(421.91,759.76) ; C188.2@452.87,520.7 C188.2@452.87,528.98 ; v1(472.84,696.77) 473.09,696.77 489,680.87 C216.2@489,644 ; C218.2@518.5,940 519,939.5 519,908 v1(524,903) ; C226.2@569.5,1042 569.5,1045.5 572.5,1048.5 576,1048.5 592.5,1065 v1(603,1065) ; v1(575.46,822.76) 587.5,834.8 C221.2@587.5,852 C225.2@587.5,890 ; v1(581,388) 581,368.94 C195.2@597.44,352.5 ; C227.2@615.5,665 616.66,666.16 616.66,686.79 v1(626.64,696.77) ; C231.2@651.32,1371.82 651.32,1368.32 654.32,1365.32 656.51,1365.32 v2(670.47,1351.36) ; C228.2@677,943.5 717.02,943.5 720.02,940.5 720.02,925.57 734.57,911.02 C223.2@734.5,888 C223.2@734.5,888 ; C260.2@679,722.5 680.5,724 698,724 702.92,728.92 v1(729,728.92) ; C201.2@708.5,501 709,500.5 v1(709,476) ; v2(730.82,1571.32) 738.32,1563.82 738.32,1546.82 C230.1@741.32,1543.82 ; C197.2@748.5,402.73 751.5,399.73 C197.2@751.5,399 ; v1(754.59,696.77) 768,683.36 768,665.5 C219.2@768.5,665 ; v1(805.77,696.77) 842.54,696.77 845.54,693.77 C209.2@845.54,691.77 ; C213.2@817.76,892.74 C213.2@820.5,890 ; C198.2@831,96.5 856.5,96.5 v1(857,97) ; C215.2@867.45,990 867.45,993.5 889,1015.05 v1(889,1023) ; D19.3_8@882.31,3347.75 884.19,3349.62 884.19,3380.82 895.37,3392 943.99,3392 951.02,3399.03 J4.S1@951.02,3457.75 ; C210.2@909.92,822.76 913.5,822.76 913.5,855.5 916.5,858.5 918.47,858.5 925.5,865.53 C212.2@925.5,890 947,890 959.31,902.32 v1(959.31,917.24) ; C194.2@919.5,347 943,347 v1(950,354) ; C261.2@995,980.5 v1@1029.97,980.5 ; C208.2@1009,713 1039.42,713 v1(1058,731.58) ; v2(1195,1833) 1213.68,1814.32 C154.2@1236.82,1814.32 ; C55.2@1462.82,374.82 1462.82,312.18 v1(1491,284) ; C148.1@1486.14,1696.82 1486.64,1696.82 1493.64,1689.82 1493.64,1688.36 1493.64,1683 1493.51,1682.87 1493.51,1648.95 C150.2@1493.64,1648.82 ; C155.2@1659,1730.5 1659,1758.47 1666.03,1765.5 1668.5,1765.5 1671.5,1768.5 1671.5,1804.14 1694.18,1826.82 C144.2@1736.82,1826.82 ; C152.2@1823.32,1728.82 C143.2@1863.82,1728.82 ; C143.2@1863.82,1730.32 C143.2@1875.41,1730.32 ; D27.3_8@1880.31,3223 v2(1880.31,3269.69) ; v1(1915.75,1745.07) 1901,1730.32 1901,1615.03 1908.03,1608 1952.47,1608 C73.2@1958.06,1602.41 ; C73.2@1942,1592 1944.82,1594.82 C73.2@1944.82,1599.82 1955.47,1599.82 1962.32,1592.97 1967.5,1592.97 ; D28.3_8@1998.31,3223 v2(1998.31,3269.69) ; D25.3_8@2117.31,3223 v2(2117.31,3269.69) ; C174.2@2169.82,3004.32 2207.68,3004.32 2220,2992 v2(2220,2970)
  Bottom Layer w15: C54.2@1950.82,608.82 2029.18,608.82 v2(2047,591)
  Bottom Layer w18: C231.2@651.32,1371.82 C232.2@651.32,1409.82 ; C234.2@765.82,1489.32 C233.2@804.82,1489.32 v1@822.32,1489.32
  Bottom Layer w20: v2(-23,2942) C163.2@12.5,2942 ; R84.2@-2,2820 v2(-2,2857) C165.2@-2,2894 ; C164.2@199,2946 v2(199,2999) ; U12.2@212.18,2857 v2(295,2857) C157.2@295,2893.5 ; v2(459.82,3068.82) C166.2@490.32,3068.82 ; v2(593.09,3212.55) D24.2@628.82,3212.55 D23.2@683.82,3212.55 ; C161.2@641.32,3078.82 641.32,3054.68 v2(648,3048) ; C162.2@649,3020.82 715.18,3020.82 v2(728,3008) 728,2984 700.82,2956.82 D22.1@653.77,2956.82 ; R88.1@736.82,3194.82 737.32,3194.32 800.32,3194.32 R89.1@800.82,3193.82 v2(842.82,3193.82) ; v2(999,1622) 1022.68,1598.32 C124.2@1041.82,1598.32 ; v2(1035.82,-58.08) 1107.92,-58.08 C26.1@1108.82,-57.18 ; v2(1057.82,1526.82) 1057.82,1507.32 C71.2@1101.22,1507.32 C72.2@1145.62,1507.32 C67.2@1190.02,1507.32 C69.2@1278.82,1507.32 ; C66.2@1077,1337.64 C66.2@1074.82,1339.82 C65.2@1154.82,1339.82 1160.46,1345.46 1201.61,1345.46 1213.32,1357.18 1213.32,1358.82 1218.32,1363.82 C63.2@1220.82,1363.82 C63.2@1228.32,1363.82 ; C63.2@1229.82,1363.82 C64.2@1273.82,1363.82 ; C44.2@1477.5,2 1477.5,-33.88 v2(1500.32,-56.71) ; D2.1@1489.82,57.09 1490.38,57.65 1490.38,85.48 v2(1490.91,86) ; C48.2@1563.82,499.82 1566.46,502.46 C58.2@1602.96,502.46 ; v2(1594,330) 1594,350 R29.1@1594.82,350.82 ; C41.2@1666.32,191.32 C41.2@1667.32,190.32 ; C42.2@1666.32,230.82 1667.32,231.82 1667.32,265.32 v2(1668,266) ; R48.1@1691.68,148.96 R48.1@1694.82,145.82 ; R59.2@1697,1947 1702,1942 1702,1939.5 1728.82,1912.68 R65.2@1728.82,1880.82 1732.82,1876.82 1732.82,1830.82 C144.2@1736.82,1826.82 ; C50.1@1712,570 1713,570 1713,565 C50.1@1721.18,556.82 ; R38.1@1879.82,611.82 C54.2@1947.82,611.82 ; C35.2@1888.32,532.32 1889.32,531.32 C35.2@1890.82,531.32 ; D6.2@1896.18,341.82 1896.18,406.18 1897.82,407.82 ; 1932.82,221 1934.82,221 1946.57,232.74 ESD1.2@1959.26,232.74 ; v2(2059,511) 2059.82,510.18 C62.2@2059.82,502.82 ; R6.1@2286.06,63.82 2290,67.76 v2(2290,127) ; C80.2@2305.32,1482.82 2324.32,1482.82 2324.32,1522.82 ; C79.2@2305.32,1522.82 2324.32,1522.82 ; C83.2@2305.32,1562.82 2324.32,1562.82 ; C81.2@2305.32,1602.82 2334.82,1602.82 2334.82,1573.32 2324.32,1562.82 ; v2(3027.82,239.82) 3035.82,247.82 C29.2@3072.82,247.82 ; v2(3176,306) 3202.37,279.63 3229.19,279.63 U8.2@3231,277.82 ; C30.2@3218.82,187.82 3253.11,187.82 3264.13,176.8 3264.13,158.52 v3(3264.82,157.82) ; C181.1@3291.32,2785.82 v2(3309.91,2785.82) ; v2(3416.82,465.5) Q9.2@3452.82,465.5 ; C178.2@3454.32,3014.82 C178.2@3454.57,3014.57 ; v2(3454.57,3046.57) C178.2@3454.57,3014.57 ; C175.2@3454.82,2976.82 3454.57,2977.07 C178.2@3454.57,3014.57 ; J1.P2@4182.73,3139.25 4183.3,3139.82 v3@4251.82,3139.82 ; J1.6@4202.41,3010.11 4250.11,3010.11 v2(4250.82,3010.82) ; 2324.32,1522.82 2324.32,1562.82
  Bottom Layer w22: C236.2@536.32,1517.82 536.82,1517.82 538.32,1519.32 538.32,1537.93 551.21,1550.82 592.82,1550.82 ; R80.2@1485,3334 1485,3390 1504,3409 1645.7,3409 1690.73,3363.96 J5.MH2@1698.77,3363.96 ; v1@1818.82,406.82 v1(1819.82,406.82) ; v3@2649.26,518.82 v3(2649.81,518.82) ; v2(3072,671) 3083.5,659.5 Q8.2@3157.42,659.5 ; Q10.2@3157.42,465.5 3158.82,464.1 v2(3158.82,430.82) ; v2(3331.82,-35.18) 3331.82,8.82 C11.2@3332.82,9.82 C11.2@3334.88,11.88 ; C11.2@3331.88,11.88 3331.88,42.93 3344.77,55.82 ; 3346.77,55.82 3448.44,55.82 ; 3449.44,55.82 3462.32,42.93 C19.2@3462.32,-6.18 ; Q6.2@3452.82,659.5 3452.82,695.82 v2(3453,696) ; v3(3794,848) 3833.64,848 R119.1@3835.82,845.82 ; v3(3860.42,713.42) Q7.2@3897.56,713.42 ; v3(4105.82,440.82) 4227.94,440.82 4240.82,453.71 Q2.2@4240.82,490.82
  Bottom Layer w25: C124.2@1041.82,1598.32 C126.2@1080.8,1598.32 C128.2@1119.77,1598.32 C127.2@1158.75,1598.32 C125.2@1197.72,1598.32 ; C129.2@1069.82,1734.82 C122.2@1130.01,1734.82 C118.2@1190.2,1734.82 1273.82,1734.82 C120.2@1278.82,1729.82 ; C129.2@1071,1736 v2(1071,1765) ; C26.1@1108.82,-57.18 1108.82,-12.31 1123.47,2.33 1140.6,2.33 D4.1@1141.09,2.82 ; D5.1@1614.55,-66.18 1615.74,-66.18 1616.23,-65.69 1616.23,-64.5 1632.45,-48.28 1632.45,-4.09 C51.2@1636.87,0.33 C52.2@1636.87,78.33 ; R102.2@2674.82,3327.82 v3(2723.82,3327.82) ; R101.2@2894.82,3327.82 v3(2943.82,3327.82) ; v2(3268.82,1876.09) 3268.82,1877.82 3269.82,1878.82 v2(3269.82,1932.82) ; C176.2@3296.82,2919.32 3326.68,2919.32 v2(3374,2872) ; C180.2@3453.82,2822.82 3479.82,2822.82 ; C179.2@3510.82,2807.32 C177.2@3554.82,2807.32 ; v2(3669.82,2681.82) 3669.82,2647.82 3684.2,2633.44 3757.63,2633.44 J1.P3@3758.91,2632.16 J1.P3@3759.25,2631.82 ; v2(3669.82,2681.82) 3711.07,2723.11 J1.9@3711.67,2723.11 ; C183.2@4245.32,3234.82 4245.32,3146.32 v3@4251.82,3139.82
  Bottom Layer w40: v3@2449.38,-39.62 R4.2@2449.38,3.82
  other v1: 908.13,154.02 754.72,217.01 805.77,217.01 729,248.63 882.54,248.5 473.09,280 575.2,280 908.13,280 754.59,437.61 959,438 422.29,449.75 626.39,500.47 754.59,500.47 575.46,759.76 754.59,759.76 959.31,759.64 805.77,822.76 473.09,917.24 575.2,917.23 805.77,917.24 575.08,980.24 2069.3,1335 725.03,1372.82 606.64,1451.71 745.03,1470.82 824.03,1490.82 1942,1591 1493.51,1655.51 1938,1962 1442.33,2013.77
  other v2: 1959.26,228.74 1713,569.59 2500,1029 3081.09,1193.82 3124.02,1193.82 3153.22,1193.82 3182.42,1193.82 3211.62,1193.82 3240.82,1193.82 1170,1347 1188,1540 2353.82,1788.57 3479.82,2835.73 2069,2994 1850,3131 1909,3131 1969,3131 2025.07,3131 2086,3131 197.68,3304.55 489.42,3304.33 196.93,3452.82 245.75,3452.82 294.56,3452.82 343.38,3452.82 392.19,3452.82 441.01,3452.82 489.82,3452.82
  other v3: 2448.82,-40.18 4128.82,1418.68 4182.18,1804.05 4193.18,2290.95 4256.11,2627.96 4254.82,3139.82 3758,3186
GPIO0_A1: R115.2 U10.R29 | length 2867.6
  Top Layer w4: U10.R29@1493.51,1604.33 1493.51,1622.51 1498,1627 v1(1511,1627)
  Top Layer w22: v2(2782,952) 2927,952 v2(2994,885)
  Routing 1 w5: 1902.07,1384.41 1944.66,1427 2288,1427 2309,1406
  Routing 1 w6: v1(1511,1627) 1547.34,1590.66 1652.34,1590.66 1690.34,1552.66 1690.34,1402.66 1721,1372 1889.66,1372 1902.07,1384.41 ; 2309,1406 2763,952 v2(2782,952)
  Routing 1 w10: v2(2994,885) v2(3646,885)
  Bottom Layer w10: R115.2@3593.82,719.82 3653.82,719.82 3685,751 3685,846 v2(3646,885)
GPIO2_A7/I2C7_SDA: R54.1 SB25.2 U10.G30 | length 1883.3
  Top Layer w6: v1(1455.12,1386.81) U10.G30@1467.92,1399.6
  Top Layer w12: SB25.2@695.82,2906.82 695.82,2309.18 v2(773,2232)
  Routing 1 w6: v2(773,2232) 774,2233 823,2233 1353,1703 1353,1679 1455.12,1576.88 v1(1455.12,1386.81)
GPIO2_B0/I2C7_SCL: R55.1 SB26.2 U10.H28 | length 1989.8
  Top Layer w6: v1(1489.82,1391.2) 1512.2,1391.2 1519.1,1398.1 U10.H28@1519.1,1425.19
  Top Layer w12: SB26.2@644.82,2906.82 644.82,2878.18 678,2845 678,2289 756,2211 v2@867.08,2211
  Routing 1 w6: v2(867.08,2210.92) 1364,1714 1364,1684.05 1467,1581.05 1467,1433 1489.82,1410.18 v1(1489.82,1391.2)
GPU_SLEEP_H: U2.A1 U10.M25 | length 2508
  Top Layer w4: U10.M25@1595.87,1527.55 1596.66,1527.55 1609.21,1515 v1(1610,1515)
  Top Layer w6: v2(2734.82,240.82) U2.A1@2745.58,251.58
  Routing 4 w5: v1(1610,1515) 1654,1515 1661.81,1507.19 1790.99,1507.19 1796.18,1501.99 2469.01,1501.99 v1(2543,1428)
  Routing 4 w10: v2(2774,382) 2774.49,382 2788.81,396.32 2796.32,396.32 2850,450 v1(2850,1333)
  Bottom Layer w5: v1(2543,1428) 2638,1333 v1(2850,1333)
  Bottom Layer w10: v2(2734.82,240.82) 2734.82,365.82 2751,382 v2(2774,382)
H1_N: J2.2 L10.2 | length 87.7
  Top Layer w10: J2.2@400.52,2894.53 404.47,2894.53 438,2861 454.98,2861 461.72,2867.75 L10.2@471.57,2867.75
H1_P: J2.3 L10.3 | length 85.1
  Top Layer w10: J2.3@400.52,2815.79 410.79,2815.79 438,2843 454.98,2843 461.72,2836.25 L10.3@471.57,2836.25
HDMI_CEC: Q3.2 R90.1 U10.AD7 | length 1828
  Top Layer w6: U10.AD7@2056.63,1834.64 2058.39,1834.64 2063.86,1829.17 2065.43,1829.17 v1(2066.17,1828.44)
  Routing 4 w8: v1(2066.17,1828.44) 2066.3,1828.57 2083.09,1828.57 2100.51,1846 2305.82,1846 2353.82,1894 2353.82,1930.82 v2(2421,1998)
  Routing 4 w12: v2(2020,2896) 2201,2715 v2(2496,2715)
  Bottom Layer w8: v2(2421,1998) 2421,1998.77 2543,2120.77 2543,2668 v2(2496,2715)
  Bottom Layer w12: 2017.47,2908.47 2017.47,2898.53 v2(2020,2896) ; R90.1@2025.32,2916.32 2027.82,2916.32 2036.82,2925.32 R90.1@2036.82,2927.82
HDMI_OUT.HDMI_TX0_N: D28.2 D28.9 J5.9 U10.AL17 | length 1639.3
  Top Layer w8: v2@1976.45,3277 1976.45,3178.3 1982.36,3172.4 1982.36,3168.96 1988.14,3163.18 J5.9@1988.14,3131.68
  Routing 1 w5: v1(1800.85,2014.03) 1800.43,2014.45 1800.43,2112.43 1883,2195 v2(1907,2195)
  Routing 1 w6: v2(1977.45,3277) 1976.34,3275.89 1976.34,3271.78 1975.45,3270.89 1975.45,3175.86 1997.81,3153.51 2001.91,3149.41 2001.91,2772 2001.91,2741 2009.91,2733 2018.57,2733 2026.57,2725 2018.57,2717 2009.91,2717 2001.91,2709 2001.91,2690 v2@2001.91,2289.91
  Bottom Layer w5: v2(1907,2195) 1908.84,2195 1913.1,2199.26 1938.26,2199.26 2000.96,2261.96 2000.96,2288.61 v2(2002.27,2289.91)
  Bottom Layer w6: v2(1977.45,3277) 1976.34,3275.89 1976.34,3264.55 1975.79,3264 1975.79,3252.42 1978.63,3249.57 D28.2@1978.63,3240.22 ; D28.9@1978.63,3205.78 D28.2@1978.63,3237.27
HDMI_OUT.HDMI_TX0_P: D28.1 D28.10 J5.7 U10.AK17 | length 1633
  Top Layer w8: J5.7@1948.77,3131.68 1948.77,3163.18 1954.55,3168.96 1954.55,3172.4 1960.45,3178.3 v2@1960.45,3277
  Routing 1 w5: v1(1800.85,1988.18) 1800.85,1989.26 1787.43,2002.68 1787.43,2117.81 1877.62,2208 1901.35,2208
  Routing 1 w6: v2(1959.45,3277) 1960.56,3275.89 1960.56,3271.78 1961.45,3270.89 1961.45,3170.06 1978.24,3153.28 1987.91,3143.61 v2@1987.91,2283.48
  Bottom Layer w5: v2(1907,2211.81) 1907.44,2212.26 1932.87,2212.26 1987.96,2267.35 1987.96,2282.25 v2(1986.73,2283.48)
  Bottom Layer w6: D28.10@1958.94,3205.78 D28.1@1958.94,3237.27 ; D28.1@1958.94,3240.22 1958.94,3249.57 1961.79,3252.42 1961.79,3264 1960.56,3265.22 1960.56,3275.89 v2(1959.45,3277)
HDMI_OUT.HDMI_TX1_N: D27.5 D27.6 J5.6 U10.AL18 | length 1551.2
  Top Layer w8: v2@1917.4,3277 1917.4,3178.3 1923.3,3172.4 1923.3,3168.96 J5.6@1929.08,3163.18
  Routing 1 w5: v1(1775,2013.77) 1775,2129 1824.82,2178.82 1828.02,2182.02 1828.87,2182.02 1832,2185.15 v2(1833.85,2185.15)
  Routing 1 w6: v2(1918.4,3277) 1917.29,3275.89 1917.29,3271.78 1916.4,3270.89 1916.4,3179.3 1943.99,3151.71 1943.99,2794.86 1943.99,2771 1951.99,2763 1960.9,2763 1968.9,2755 1960.9,2747 1951.99,2747 1943.99,2739 1943.99,2720 v2(1943.99,2438)
  Routing 4 w5: v2(1833.85,2185.15) 1833.85,2187 1836.98,2190.13 1836.98,2190.98 1884.6,2238.6 1884.6,2318.05 1942.08,2375.53 1942.08,2433 1942.68,2433.6 1942.68,2436.7 v2(1943.99,2438)
  Bottom Layer w6: D27.5@1916.84,3252.42 1916.84,3264 ; 1917.4,3264.55 v2@1917.4,3275.89 ; D27.6@1919.69,3205.78 D27.5@1919.69,3237.27
HDMI_OUT.HDMI_TX1_P: D27.4 D27.7 J5.4 U10.AK18 | length 1551.5
  Top Layer w8: J5.4@1889.71,3163.18 1895.49,3168.96 1895.49,3172.4 1901.4,3178.3 v2@1901.4,3277
  Routing 1 w5: v1(1774.08,1987.93) 1774.08,1988.18 1762,2000.26 1762,2134.39 1765.81,2138.2 1818.83,2191.21 1818.83,2192.06 1821.96,2195.2 v2(1821.96,2197.04)
  Routing 1 w6: v2(1900.4,3277) 1901.51,3275.89 1901.51,3271.78 1902.4,3270.89 1902.4,3173.5 1929.99,3145.91 1929.99,2442.38 1927.18,2439.57 v2(1927.18,2438)
  Routing 4 w5: v2(1821.96,2197.04) 1823.8,2197.04 1826.94,2200.17 1827.79,2200.17 1871.6,2243.98 1871.6,2323.43 1929.08,2380.92 1929.08,2433 1928.48,2433.6 1928.48,2436.7 v2(1927.18,2438)
  Bottom Layer w6: D27.7@1900,3205.78 D27.4@1900,3237.27 ; 1901.62,3265.22 v2@1901.62,3275.89 ; D27.4@1902.84,3252.42 1902.84,3264
HDMI_OUT.HDMI_TX2_N: D27.2 D27.9 J5.3 U10.AL19 | length 1589.2
  Top Layer w8: v2@1858.34,3277 1858.34,3178.3 1864.25,3172.4 1864.25,3168.96 J5.3@1870.03,3163.18
  Routing 1 w6: v2(1859.34,3277) 1858.23,3275.89 1858.23,3271.78 1857.34,3270.89 1857.34,3176.46 1889,3144.8 v2@1889,2389.51
  Routing 4 w6: v1(1747.41,2013.77) 1747.41,2356.21 1789.2,2398 1886.89,2398 1890.41,2394.49 v2(1890.41,2384)
  Bottom Layer w6: D27.2@1857.79,3252.42 1857.79,3264 ; 1858.34,3264.55 v2@1858.34,3275.89 ; D27.9@1860.63,3205.78 D27.2@1860.63,3237.27
HDMI_OUT.HDMI_TX2_P: D27.1 D27.10 J5.1 U10.AK19 | length 1602.3
  Top Layer w8: J5.1@1830.66,3163.18 1836.44,3168.96 1836.44,3172.4 1842.34,3178.3 v2@1842.34,3277
  Routing 1 w6: v2(1841.34,3277) 1842.45,3275.89 1842.45,3271.78 1843.34,3270.89 1843.34,3170.66 1875,3139 1875,2821 1875,2802 1867,2794 1859.21,2794 1851.21,2786 1859.21,2778 1867,2778 1875,2770 1875,2721 1875,2389.51 1874.71,2389.22 1874.71,2385.11 v2(1873.59,2384)
  Routing 4 w6: v1(1749.38,1987.93) 1749.38,1988.15 1760.72,1999.49 1760.72,2349.72 1795,2384 v2(1873.59,2384)
  Bottom Layer w6: D27.10@1840.94,3205.78 D27.1@1840.94,3237.27 ; 1842.56,3265.22 v2@1842.56,3275.89 ; D27.1@1843.79,3252.42 1843.79,3264
HDMI_OUT.HDMI_TXC_N: D28.5 D28.6 J5.12 U10.AL16 | length 1741.6
  Top Layer w8: v2@2035.51,3277 2035.51,3178.3 2041.41,3172.4 2041.41,3168.96 2047.19,3163.18 J5.12@2047.19,3131.68
  Routing 1 w5: v1(1826.18,2014.03) 1826.18,2013.77 1832.48,2007.48 1917,2007.48 1922,2012.48 1922,2160.53 1965.56,2204.09 1996.67,2204.09 ; v2@2052.47,2253 2052.47,2265.01 2052.97,2265.51
  Routing 1 w6: v2(2036.51,3277) 2035.4,3275.89 2035.4,3271.78 2034.51,3270.89 2034.51,3178.29 2052.97,3159.83 2052.97,2265.51
  Routing 4 w5: v2(2003,2206) 2001.7,2204.7 1998.12,2204.7 ccw(c1998.12,2202.64) 1996.67,2204.09 1981.11,2204.09 1969.61,2215.6 1969.61,2230.61 1976,2237 2004.65,2237 2015.06,2226.59 2038.72,2226.59 2054.38,2242.25 v2(2054.38,2253)
  Bottom Layer w6: D28.5@2034.84,3252.42 2034.84,3264 ; 2035.4,3264.55 v2@2035.4,3275.89 ; D28.6@2037.69,3205.78 D28.5@2037.69,3237.27
HDMI_OUT.HDMI_TXC_P: D28.4 D28.7 J5.10 U10.AK16 | length 1730
  Top Layer w8: J5.10@2007.82,3163.18 2013.6,3168.96 2013.6,3172.4 2019.51,3178.3 v2@2019.51,3277
  Routing 1 w5: v1(1826.18,1988.18) 1832.48,1994.48 1922.38,1994.48 1935,2007.09 1935,2155.15 1970.95,2191.09 1996.67,2191.09 ; 2038.97,2265.51 2039.47,2265.01 v2@2039.47,2253
  Routing 1 w6: v2(2018.51,3277) 2019.62,3275.89 2019.62,3271.78 2020.51,3270.89 2020.51,3172.49 2038.97,3154.03 2038.97,2265.51
  Routing 4 w5: v2(2003,2189.19) 2001.7,2190.49 1997.27,2190.49 1996.67,2191.09 1975.73,2191.09 1956.61,2210.21 1956.61,2235.99 1970.62,2250 2010.03,2250 2020.44,2239.59 2034.64,2239.59 2037.57,2242.52 v2(2037.57,2253)
  Bottom Layer w6: D28.7@2018,3205.78 D28.4@2018,3237.27 ; 2019.62,3265.22 v2@2019.62,3275.89 ; D28.4@2020.84,3252.42 2020.84,3264